# Altium PCB DB32.PcbDoc (part 4 of 8)
Units mil, origin at the board's own origin, x right, y up, seen from the top; angles counter-clockwise.
Board outline 3236.22 x 4456.69 mil, 8 copper layers (Top Layer, MidLayer1, MidLayer2, GND-Layer5, MidLayer3, VCC, MidLayer4, Bottom Layer), stack 61.8 mil thick; 207 components, 474 nets, 1777 pads, 1474 vias.
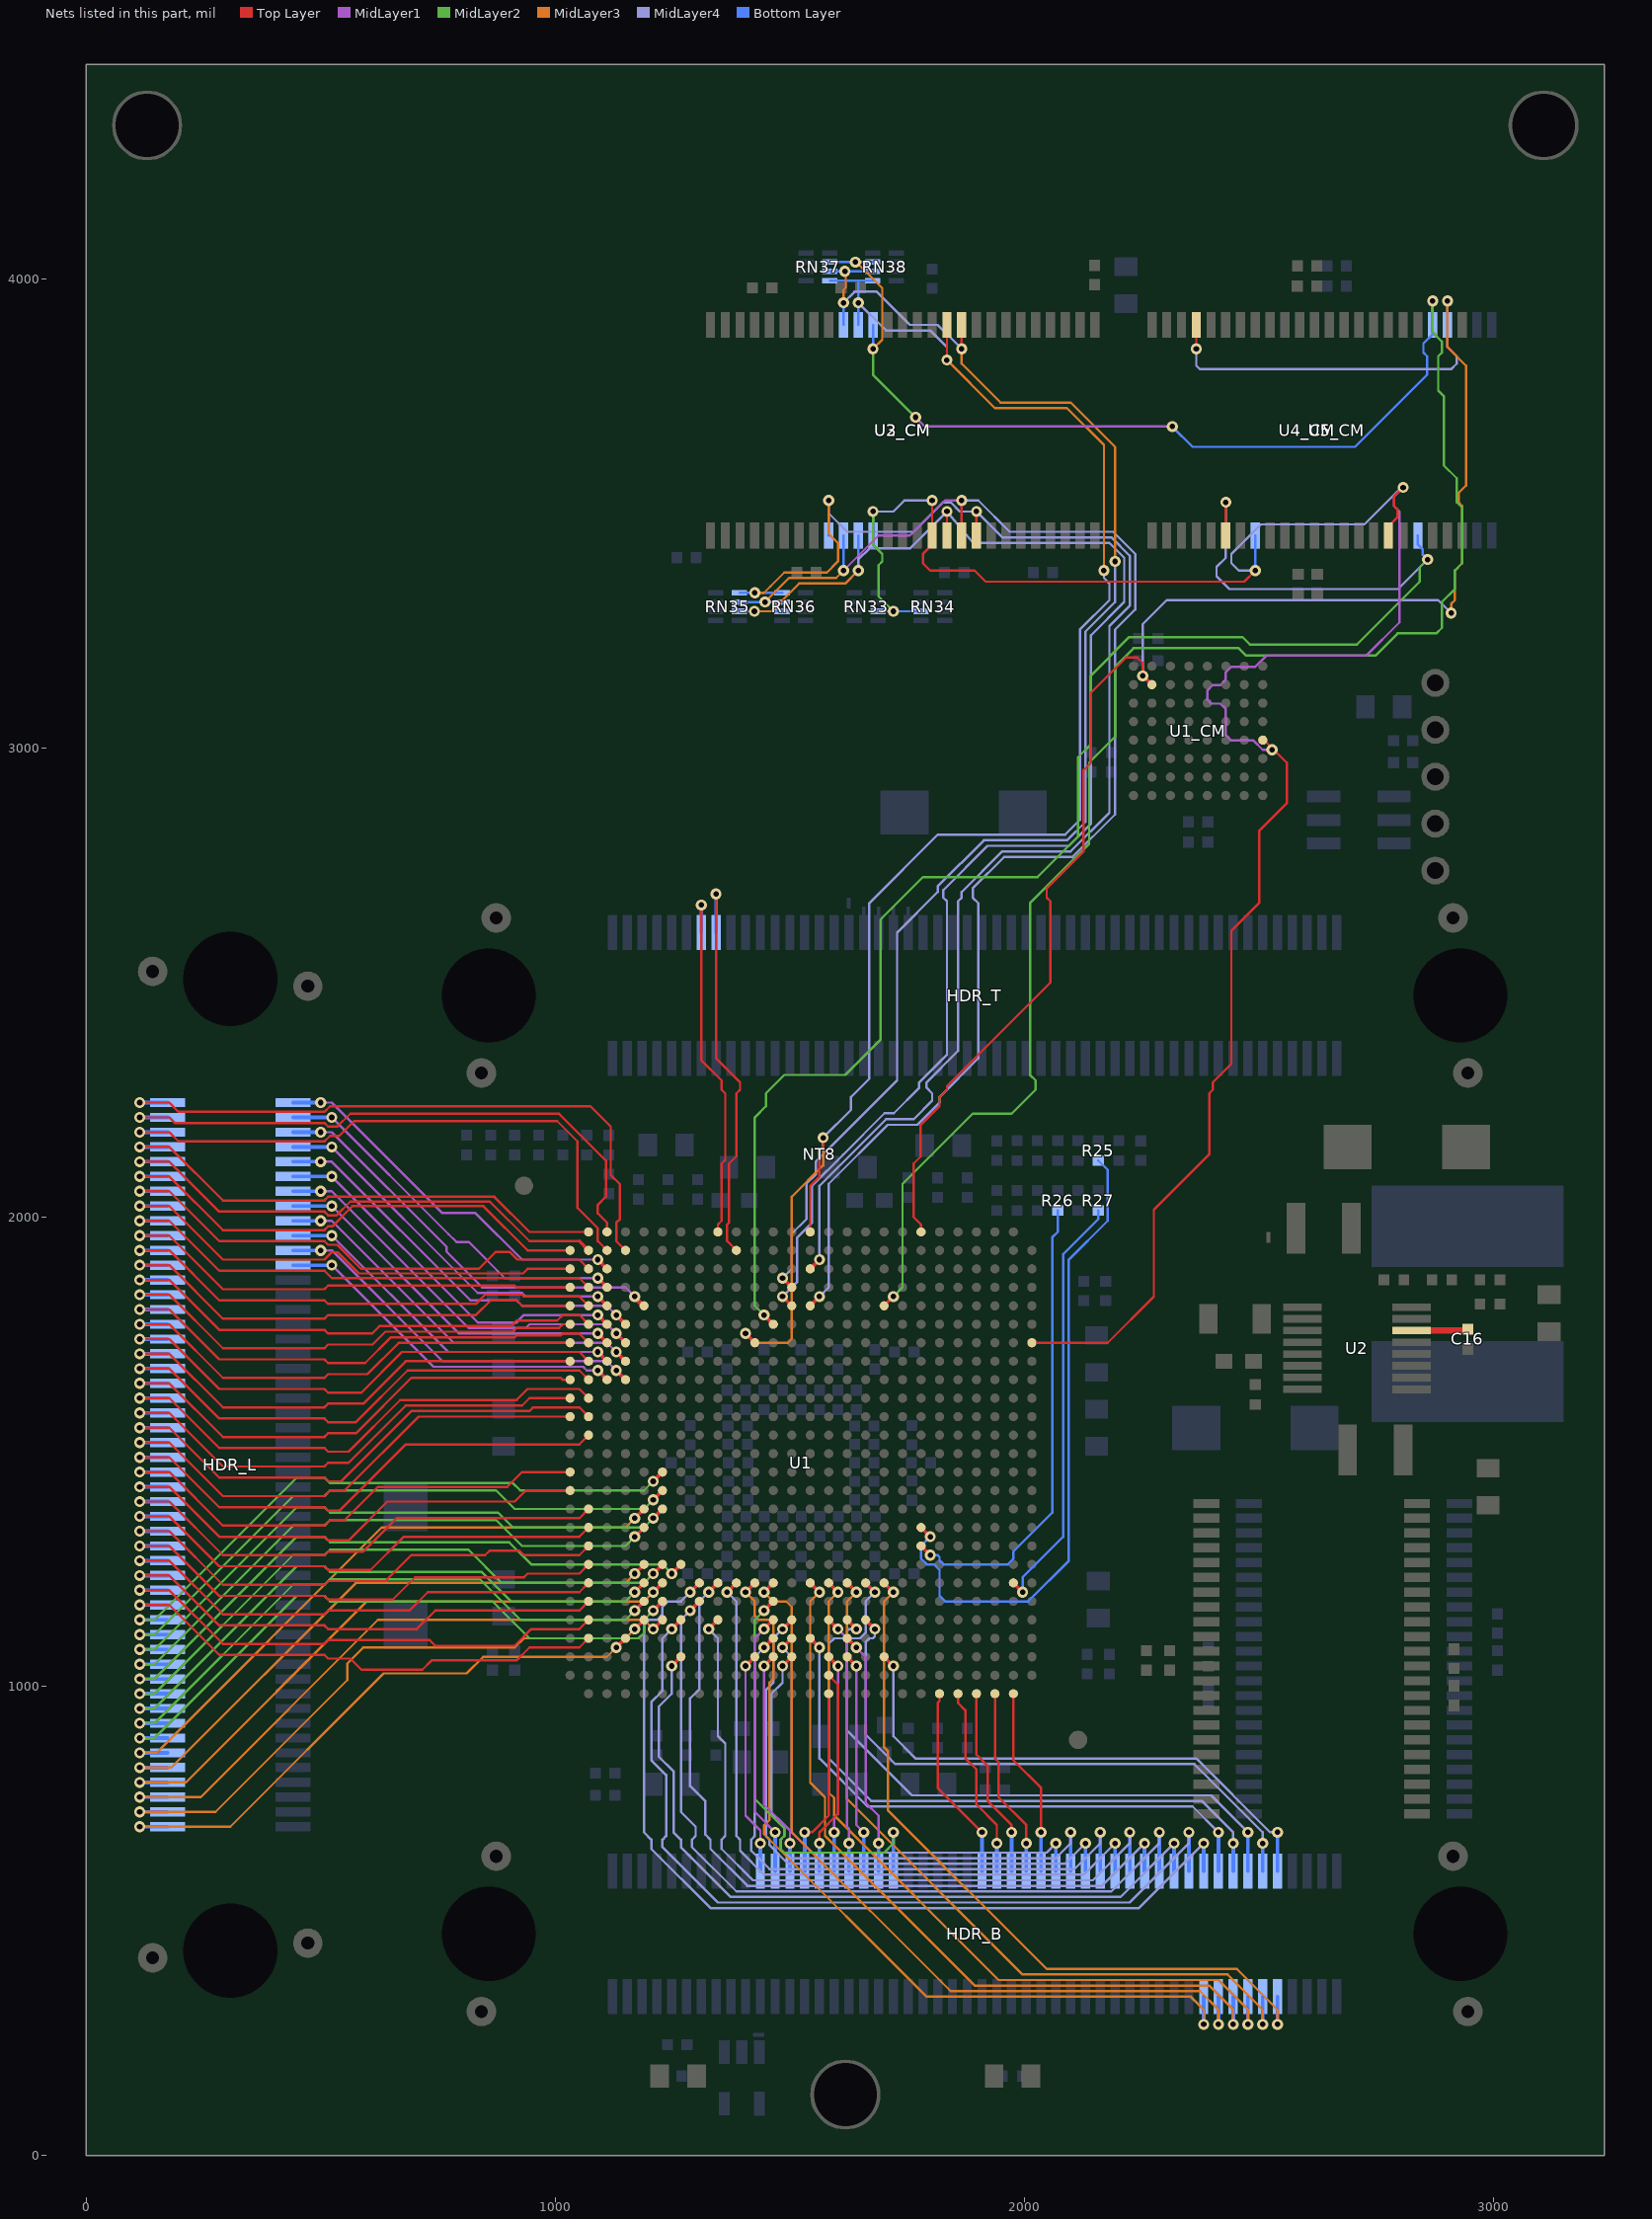
[diagram p10: the nets of this part, all layers, seen from the top]

## Via types
v1: diameter 23.62, hole 11.81, Top Layer to Bottom Layer, 839 vias
v2: diameter 23.62, hole 11.81, Top Layer to Bottom Layer, tented both sides, 499 vias
v3: diameter 27.56, hole 15.75, Top Layer to Bottom Layer, 135 vias
v4: diameter 23.62, hole 11.81, Top Layer to Bottom Layer, tented top, 1 vias

## Nets (pads, with @x,y where several pads share a name; then routed paths per layer and width w, separated by ;. In a path a pad name is that pad's centre, name@x,y a point inside that pad or via, vN(x,y) a via of type N, cw(c..) or ccw(c..) an arc to the next point about the centre after c; other vN are vias at no path point) (continued)
BUS_NBE3: RN37.6 RN38.7 U1.E18 U3_CM.39 U5_CM.40 | length 5006.7
  Top Layer w7.87: U1.E18@1700.79,1811.02 v1(1720.47,1830.71)
  MidLayer1 w5: v2(1767.72,3704.72) 1787.4,3685.04 v2(2314.96,3685.04)
  MidLayer2 w5: v2(1677.17,3850.39) 1677.17,3795.28 v2(1767.72,3704.72) ; v1(1720.47,1830.71) 1740.16,1850.39 1740.16,2031.5 1740.16,2039.37 1740.16,2070.86 1889.76,2220.47 1972.44,2220.47 2023.62,2271.65 2023.62,2291.34 2011.81,2303.15 2011.81,2669.29 2137.8,2795.28 2137.8,2968.5 2192.91,3023.62 2192.91,3173.23 2232.28,3212.6 2456.69,3212.6 2472.44,3196.85 2748.03,3196.85 2795.28,3244.1 2877.95,3244.1 2889.76,3255.91 2889.76,3311.02 2917.32,3338.58 2917.32,3377.95 2933.07,3393.7 2933.07,3511.81 2921.26,3523.62 2921.26,3574.8 2893.7,3602.36 2893.7,3750 2881.89,3761.81 2881.89,3834.65 2889.76,3842.52 2889.76,3866.14 2870.08,3885.83 v2(2870.08,3952.76)
  MidLayer3 w5: v1@1641.54,4035.43 1696.85,3980.12 1696.85,3870.08 v2(1677.17,3850.39)
  Bottom Layer w5: RN37.6@1586.22,4035.43 v1(1639.78,4035.43) RN38.7@1676.19,4035.43 RN38.7@1677.56,4035.43 ; v2(1677.17,3850.39) U3_CM.39@1677.17,3901.57 ; v2(2314.96,3685.04) 2358.27,3641.73 2704.72,3641.73 2858.27,3795.28 2858.27,3834.65 2850.39,3842.52 2850.39,3862.2 2870.08,3881.89 U5_CM.40@2870.08,3901.57 v2(2870.08,3952.76)
BUS_NOE: U1.A20 U1_CM.G2 U4_CM.41 U5_CM.41 | length 3868.3
  Top Layer w5: U1.A20@1779.53,1968.5 1779.53,1984.25 1763.78,2000 1763.78,2031.5 1763.78,2043.31 1763.78,2114.17 1778.54,2128.94 1778.54,2195.87 1818.9,2236.22 1818.9,2255.91 1834.64,2271.65 1834.64,2279.53 2055.12,2500 2055.12,2673.23 2047.24,2681.1 2047.24,2700.79 2125.98,2779.53 2125.98,2952.76 2141.73,2968.5 2141.73,3118.11 2216.54,3192.91 2240.16,3192.91 2251.97,3181.1 v1@2251.97,3154.53 ; v1@2255.91,3150.59 2255.91,3153.54 v1@2255.91,3154.53 ; v2(2366.14,3850.39) U4_CM.41@2366.14,3901.57
  Top Layer w7.87: v1@2251.97,3154.53 2252.46,3154.04 2255.91,3150.59 U1_CM.G2@2271.65,3134.84
  MidLayer3 w5: v2(2901.58,3952.76) 2901.57,3854.33 2940.94,3814.96 2940.94,3559.06 2925.2,3543.31 2925.2,3523.62 2933.07,3515.75 2933.07,3393.7 2917.32,3377.95 2917.32,3314.96 2909.45,3307.09 v1(2909.45,3287.4)
  MidLayer4 w5: v1(2251.97,3153.54) 2251.97,3263.78 2303.15,3314.96 2881.89,3314.96 v1(2909.45,3287.4) ; v2(2366.14,3850.39) 2366.14,3814.96 2374.02,3807.09 2909.45,3807.09 2921.26,3818.9 2921.26,3834.65 2901.58,3854.33 v2(2901.58,3952.76)
  Bottom Layer w5: U5_CM.41@2901.57,3901.57 v2(2901.58,3952.76)
BUS_NWE: RN33.7 RN34.6 U1.G26 U1_CM.A5 U2_CM.16 U3_CM.16 U4_CM.17 U5_CM.17 | length 4738.4
  Top Layer w5: U2_CM.16@1803.14,3452.75 v2(1803.14,3527.55) ; U2_CM.16@1803.15,3460.62 U2_CM.16@1803.15,3452.76 1803.15,3433.07 1783.46,3413.39 1783.46,3393.7 1799.21,3377.95 1893.7,3377.95 1917.32,3354.33 2468.5,3354.33 v1(2492.13,3377.95) ; U1.G26@2015.75,1732.28 2078.74,1732.28 2090.55,1732.28 2177.17,1732.28 2275.59,1830.71 2275.59,2015.75 2393.7,2133.86 2393.7,2263.78 2401.57,2271.65 2401.57,2287.4 2440.94,2326.77 2440.94,2610.24 2500,2669.29 2500,2822.83 2559.06,2881.89 2559.06,2968.5 2529.53,2998.03 2510.82,3016.74 U1_CM.A5@2507.87,3016.73 ; U4_CM.17@2775.59,3452.76 2775.59,3472.44 2795.28,3492.13 2795.28,3507.87 2787.4,3515.75 2787.4,3535.43 v1(2807.09,3555.12)
  MidLayer1 w5: v1(2527.56,2996.06) 2507.87,2996.06 2488.19,3015.75 2440.94,3015.75 2429.13,3027.56 2429.13,3082.68 2417.32,3094.49 2397.64,3094.49 2389.76,3102.36 2389.76,3122.05 2401.57,3133.86 2417.32,3133.86 2429.13,3145.67 2429.13,3161.42 2440.94,3173.23 2492.13,3173.23 2515.75,3196.85 2728.35,3196.85 2799.21,3267.72 2799.21,3503.94 2787.4,3515.75 2787.4,3535.43 v1(2807.09,3555.12)
  MidLayer2 w5: v2(1677.17,3503.94) 1677.17,3433.07 1696.85,3413.39 1696.85,3397.64 1688.98,3389.76 1688.98,3322.83 v1(1720.47,3291.34)
  MidLayer4 w5: v2(1677.17,3503.94) 1720.47,3503.94 1744.09,3527.55 v2(1803.14,3527.55) ; v1(2492.13,3377.95) 2456.69,3377.95 2440.94,3393.7 2440.94,3413.39 2503.94,3476.38 2724.41,3476.38 v1@2805.12,3557.09
  Bottom Layer w5: U3_CM.16@1677.17,3452.76 v2(1677.17,3503.94) ; RN33.7@1688.18,3291.34 v1(1720.47,3291.34) RN34.6@1779.53,3291.34 RN34.6@1779.92,3291.34 ; v1(2492.13,3377.95) U5_CM.17@2492.13,3452.76
BUS_SDRAM_CKE: RN37.7 RN38.6 U1.D13 U2_CM.37 U3_CM.37 | length 3199.4
  Top Layer w5: v2(1866.14,3850.39) U2_CM.37@1866.14,3901.57
  Top Layer w7.87: v1(1484.25,1870.08) U1.D13@1503.94,1850.39
  MidLayer3 w5: v2(1614.17,3948.82) 1614.17,3976.38 1618.9,3981.11 v1@1618.9,4015.75 ; v2(1866.14,3850.39) 1866.14,3818.9 1948.82,3736.22 2098.43,3736.22 2192.91,3641.73 v1(2192.91,3397.64)
  MidLayer4 w5: v1(1484.25,1870.08) 1503.94,1889.76 1503.94,1964.57 1535.43,1996.06 1535.43,2031.5 1535.43,2043.31 1535.43,2070.87 1555.12,2090.55 1555.12,2118.11 1728.35,2291.34 1728.35,2606.3 1814.96,2692.91 1814.96,2704.72 1913.39,2803.15 2090.55,2803.15 2129.92,2842.52 2129.92,3248.03 2192.91,3311.02 v1(2192.91,3397.64) ; v2(1614.17,3948.82) 1637.8,3972.44 1685.04,3972.44 1755.91,3901.57 1814.96,3901.57 v2(1866.14,3850.39)
  Bottom Layer w5: RN37.7@1586.22,4015.75 v1(1617.14,4015.75) RN38.6@1676.19,4015.75 RN38.6@1677.56,4015.75 ; U3_CM.37@1614.17,3901.57 v2(1614.17,3948.82)
BUS_SDRAM_CLK: NT8.2 RN37.8 RN38.5 U1.G11 U2_CM.38 U3_CM.38 | length 3444.5
  Top Layer w5: NT8.2@1562.99,2141.73 1570.87,2149.61 v1(1570.87,2169.29) ; v2(1834.64,3826.77) U2_CM.38@1834.65,3901.57
  Top Layer w7.87: v1(1405.51,1751.97) U1.G11@1425.2,1732.28
  MidLayer3 w5: v1(1405.51,1751.97) 1425.2,1732.28 1496.06,1732.28 1503.94,1740.16 1503.94,2043.31 1570.87,2110.24 v1(1570.87,2169.29) ; v2(1834.64,3826.77) 1937,3724.41 2090.55,3724.41 2169.29,3645.67 v1(2169.29,3377.95)
  MidLayer4 w5: v1(1570.87,2169.29) 1629.92,2228.35 1629.92,2255.91 1669.29,2295.28 1669.29,2669.29 1814.96,2814.96 2086.61,2814.96 2118.11,2846.46 2118.11,3251.97 2181.1,3314.96 2181.1,3350.39 2169.29,3362.2 v1(2169.29,3377.95) ; v2(1645.67,3948.82) 1704.72,3889.76 1799.21,3889.76 1834.64,3854.34 v2(1834.64,3826.77)
  Bottom Layer w5: RN37.8@1586.22,3996.06 RN38.5@1676.19,3996.06 RN38.5@1677.56,3996.06 ; U3_CM.38@1645.67,3901.57 v2(1645.67,3948.82) 1645.67,3996.06
BUS_SDRAM_FEEDBACK: NT8.1 U1.A14 | length 165.6
  Top Layer w5: U1.A14@1543.31,1968.5 1543.31,2066.93 1562.99,2086.61 NT8.1@1562.99,2125.98
BUS_SDRAM_NCAS: RN35.7 RN36.6 U1.E13 U2_CM.17 U3_CM.17 | length 3175.8
  Top Layer w5: U2_CM.17@1834.65,3452.76 1834.64,3499.99 v1(1834.65,3503.94)
  Top Layer w7.87: v1(1484.25,1830.71) U1.E13@1503.94,1811.02
  MidLayer3 w5: v1(1424.23,3291.34) 1460.63,3291.34 1519.68,3350.39 1618.11,3350.39 v2(1645.67,3377.95)
  MidLayer4 w5: v1(1484.25,1830.71) 1515.75,1862.2 1515.75,1956.69 1547.24,1988.19 1547.24,2031.5 1547.49,2043.31 1547.49,2067.18 1613.19,2132.87 1701.77,2221.46 1721.46,2221.46 1775.59,2275.59 1775.59,2287.4 1834.65,2346.46 1834.65,2673.23 1826.77,2681.1 1826.77,2696.85 1921.26,2791.34 2094.49,2791.34 2141.73,2838.58 2141.73,3240.16 2212.6,3311.02 2212.6,3405.51 2181.1,3437.01 1890.42,3437.01 v1(1834.65,3503.94) 1755.91,3425.2 1669.29,3425.2 1645.67,3401.57 v2(1645.67,3377.95)
  Bottom Layer w5: RN35.7@1393.3,3291.34 v1(1424.23,3291.34) RN36.6@1483.28,3291.34 RN36.6@1484.64,3291.34 ; v2(1645.67,3377.95) U3_CM.17@1645.67,3452.76
BUS_SDRAM_NCS: RN35.5 RN36.8 U1.C14 U2_CM.19 U3_CM.19 | length 3250.4
  Top Layer w5: U2_CM.19@1897.64,3452.76 v2(1897.63,3503.93)
  Top Layer w7.87: U1.C14@1543.31,1889.76 v1(1562.99,1909.45)
  MidLayer3 w5: v1(1425.2,3330.71) 1444.88,3330.71 1458.54,3344.36 1488.19,3374.02 1578.74,3374.02 1602.36,3397.64 1602.36,3437.01 1582.68,3456.69 v2(1582.68,3527.56)
  MidLayer4 w5: v1(1562.99,1909.45) 1562.99,2031.5 1562.99,2043.31 1562.99,2066.93 1704.72,2208.66 1763.78,2208.66 1803.15,2248.03 1803.15,2263.78 1791.34,2275.59 1791.34,2287.4 1858.27,2354.33 1858.27,2673.23 1866.14,2681.1 1866.14,2692.91 1952.76,2779.53 2098.43,2779.53 2181.1,2862.2 2181.1,3259.84 2224.41,3303.15 2224.41,3409.45 2185.04,3448.82 1952.76,3448.82 v2(1897.63,3503.93) 1862.21,3503.93 1842.52,3523.62 1826.77,3523.62 1763.78,3460.63 1622.05,3460.63 1582.68,3500 v2(1582.68,3527.56)
  Bottom Layer w5: RN35.5@1393.31,3330.71 v1(1425.2,3330.71) RN36.8@1483.28,3330.71 RN36.8@1484.26,3330.71 ; U3_CM.19@1582.68,3452.76 v2(1582.68,3527.56)
BUS_SDRAM_NRAS: RN35.6 RN36.7 U1.E14 U2_CM.18 U3_CM.18 | length 3197.5
  Top Layer w5: U2_CM.18@1866.14,3452.76 v1(1866.14,3527.55)
  Top Layer w7.87: U1.E14@1543.31,1811.02 v1(1562.99,1830.71)
  MidLayer1 w5: v2(1614.17,3377.95) 1688.98,3452.76 1755.91,3452.76 1830.7,3527.55 v1(1866.14,3527.55)
  MidLayer3 w5: v1(1446.86,3311.02) 1498.05,3362.2 1598.43,3362.2 v2(1614.17,3377.95)
  MidLayer4 w5: v1(1562.99,1830.71) 1582.68,1850.39 1582.68,2031.5 1582.68,2043.31 1582.68,2070.87 1708.66,2196.85 1771.65,2196.85 1818.9,2244.09 1818.9,2255.91 1901.57,2338.58 1901.57,2669.29 1889.76,2681.1 1889.76,2700.79 1956.69,2767.72 2102.36,2767.72 2192.91,2858.27 2192.91,3251.97 2236.22,3295.28 2236.22,3413.39 2188.98,3460.63 1968.5,3460.63 1901.58,3527.55 v1(1866.14,3527.55) v1@1858.27,3531.5
  Bottom Layer w5: RN35.6@1393.3,3311.02 v1(1446.86,3311.02) RN36.7@1483.28,3311.03 RN36.7@1484.64,3311.02 ; v2(1614.17,3377.95) U3_CM.18@1614.17,3452.76
BUS_SRAM_NCS: U1.F12 U4_CM.6 U5_CM.6 | length 3549.4
  Top Layer w5: U4_CM.6@2429.13,3452.76 2429.13,3503.94 v2(2429.13,3523.62)
  Top Layer w7.87: v1(1444.88,1791.34) U1.F12@1464.57,1771.65
  MidLayer2 w5: v1(1444.88,1791.34) 1425.2,1811.02 1425.2,2031.49 1425.2,2043.31 1425.2,2212.6 1448.82,2236.22 1448.82,2244.09 1448.82,2263.78 1488.19,2303.15 1618.11,2303.15 1692.91,2377.95 1692.91,2633.86 1783.46,2724.41 2027.56,2724.41 2114.17,2811.02 2114.17,2980.32 2141.73,3007.87 2141.73,3154.53 2223.42,3236.22 2464.57,3236.22 2480.32,3220.47 2708.66,3220.47 2842.52,3354.33 2842.52,3384.83 v2(2859.27,3401.57)
  MidLayer4 w5: v2(2429.13,3523.62) 2429.13,3405.51 2409.45,3385.83 2409.45,3366.14 2437.01,3338.58 2796.28,3338.58 v2(2859.27,3401.57)
  Bottom Layer w5: U5_CM.6@2838.58,3452.76 2838.58,3433.42 2848.92,3423.08 2848.92,3411.92 v2(2859.27,3401.57)
BUZZER: HDR_B.40 U1.AA12 | length 931.1
  Top Layer w7.87: v1(1444.88,1161.42) U1.AA12@1464.57,1181.1
  MidLayer2 w5: v1(1444.88,1161.42) 1425.2,1141.73 1425.2,921.26 1425.2,909.45 1425.2,759.84 1488.19,696.85 1488.19,681.1 1480.31,673.23 1480.31,653.54 1488.19,645.67 1700.79,645.67 1720.47,665.35 v2(1720.47,688.98)
  Bottom Layer w7.87: HDR_B.40@1720.48,606.3 v2(1720.47,688.98)
CAN_RXD: HDR_T.14 U1.A9 | length 783.6
  Top Layer w5: v2(1311.02,2665.35) 1311.02,2334.65 1354.33,2291.34 1354.33,2271.65 1362.2,2263.78 1362.2,2122.05 1354.33,2114.17 1354.33,2043.31 1354.33,2031.5 1354.33,1992.13 1346.46,1984.25 U1.A9@1346.46,1968.5
  Bottom Layer w7.87: HDR_T.14@1311.02,2606.3 v2(1311.02,2665.35)
CAN_TXD: HDR_T.16 U1.B10 | length 883.3
  Top Layer w5: v2(1342.52,2688.98) 1342.52,2338.58 1393.7,2287.4 1393.7,2271.65 1385.83,2263.78 1385.83,2129.92 1370.08,2114.17 1370.08,2043.31 1370.08,2031.5 1370.08,1988.19 1366.14,1984.25 1366.14,1948.82 U1.B10@1385.83,1929.13
  Bottom Layer w7.87: HDR_T.16@1342.52,2606.3 v2(1342.52,2688.98)
CCLK: R26.2 U1.V20 | length 1004.4
  Top Layer w7.87: U1.V20@1779.53,1299.21 v1(1799.21,1279.53)
  Bottom Layer w5: v1(1799.21,1279.53) 1814.96,1279.53 1818.9,1275.59 1818.9,1267.72 1826.77,1259.84 1964.57,1259.84 1976.38,1271.65 1976.38,1287.4 2059.06,1370.08 2059.06,1956.69 2070.86,1968.5 R26.2@2070.86,2014.25
COMP: C16.2 U2.6 | length 121.4
  Top Layer w13.78: U2.6@2824.58,1758.25 2942.3,1758.25 C16.2@2944.88,1760.82
DATA_DIN: R27.2 U1.Y25 | length 908.2
  Top Layer w7.87: U1.Y25@1976.38,1220.47 v1(1996.07,1200.79)
  Bottom Layer w5: v1(1996.07,1200.79) 1996.07,1232.29 2082.68,1318.9 2082.68,1921.26 2157.48,1996.06 R27.2@2157.48,2014.25
DAU_RESET_SW: HDR_B.38 U1.AC16 | length 523.8
  Top Layer w7.87: U1.AC16@1622.05,1102.36 v1(1641.73,1082.68)
  MidLayer1 w5: v1(1641.73,1082.68) 1661.42,1062.99 1661.42,921.26 1661.42,909.45 1661.42,751.97 1688.98,724.41 v2(1688.98,665.35)
  Bottom Layer w7.87: HDR_B.38@1688.98,606.3 v2(1688.98,665.35)
DAU_TFT_BLIGHT: HDR_B.91 U1.Y18 | length 1601.2
  Top Layer w7.87: U1.Y18@1700.79,1220.47 v1(1720.47,1200.79)
  MidLayer3 w5: v1(1720.47,1200.79) 1700.79,1181.1 1700.79,921.26 1700.79,909.45 1700.79,870.08 1708.66,862.2 1708.66,736.22 2047.24,397.64 2452.76,397.64 2539.37,311.02 v2(2539.37,279.53)
  Bottom Layer w7.87: v2(2539.37,279.53) HDR_B.91@2539.37,338.58
DAU_TFT_BLUE0: HDR_B.62 U1.AC13 | length 1077.8
  Top Layer w7.87: v1(1484.25,1082.68) U1.AC13@1503.94,1102.36
  MidLayer4 w5: v1(1484.25,1082.68) 1503.94,1062.99 1503.94,921.26 1503.94,909.45 1503.94,688.98 1547.24,645.67 2047.24,645.67 v2(2066.93,665.35)
  Bottom Layer w7.87: HDR_B.62@2066.93,606.3 v2(2066.93,665.35)
DAU_TFT_BLUE1: HDR_B.64 U1.AD13 | length 1187.7
  Top Layer w7.87: v1(1484.25,1043.31) U1.AD13@1503.94,1062.99
  MidLayer4 w5: v1(1484.25,1043.31) 1484.25,1007.87 1460.63,984.25 1460.63,921.26 1460.63,909.45 1460.63,728.35 1488.19,700.79 1488.19,681.1 1480.31,673.23 1480.31,653.54 1500,633.86 2066.93,633.86 2098.42,665.35 v2(2098.42,688.98)
  Bottom Layer w7.87: v2(2098.42,688.98) HDR_B.64@2098.43,606.3
DAU_TFT_BLUE2: HDR_B.66 U1.AB13 | length 1272.9
  Top Layer w7.87: v1(1484.25,1122.05) U1.AB13@1503.94,1141.73
  MidLayer4 w5: v1(1484.25,1122.05) 1464.57,1102.36 1464.57,1007.87 1448.82,992.13 1448.82,921.26 1448.82,909.45 1448.82,681.1 1456.69,673.23 1456.69,661.42 1496.06,622.05 2086.62,622.05 v2(2129.92,665.35)
  Bottom Layer w7.87: HDR_B.66@2129.92,606.3 v2(2129.92,665.35)
DAU_TFT_BLUE3: HDR_B.68 U1.AC12 | length 1361.9
  Top Layer w7.87: v1(1444.88,1082.68) U1.AC12@1464.57,1102.36
  MidLayer4 w5: v1(1444.88,1082.68) 1425.2,1062.99 1425.2,921.26 1425.2,909.45 1425.2,681.1 1417.32,673.23 1417.32,649.61 1456.69,610.24 2106.3,610.24 2161.42,665.35 v2(2161.42,688.98)
  Bottom Layer w7.87: HDR_B.68@2161.42,606.3 v2(2161.42,688.98)
DAU_TFT_BLUE4: HDR_B.70 U1.Y10 | length 1497.6
  Top Layer w7.87: v1(1366.14,1200.79) U1.Y10@1385.83,1220.47
  MidLayer4 w5: v1(1366.14,1200.79) 1385.83,1181.1 1385.83,921.26 1385.83,909.45 1385.83,681.1 1393.7,673.23 1393.7,649.61 1444.88,598.43 2125.98,598.43 v2(2192.91,665.35)
  Bottom Layer w7.87: HDR_B.70@2192.92,606.3 v2(2192.91,665.35)
DAU_TFT_CL1: HDR_B.88 U1.Y17 | length 1385.8
  Top Layer w7.87: U1.Y17@1661.42,1220.47 v1(1681.1,1200.79)
  MidLayer4 w5: v1(1681.1,1200.79) 1661.42,1181.1 1661.42,1114.17 1649.61,1102.36 1629.92,1102.36 1622.05,1094.49 1622.05,921.26 1622.05,909.45 1622.05,905.51 1759.84,767.72 2397.64,767.72 v2@2476.38,688.98
  Bottom Layer w7.87: HDR_B.88@2476.38,606.3 v2(2476.38,688.98)
DAU_TFT_CL2: HDR_B.90 U1.AB17 | length 1339.6
  Top Layer w7.87: U1.AB17@1661.42,1141.73 v1(1681.1,1122.05)
  MidLayer4 w5: v1(1681.1,1122.05) 1681.1,1106.3 1677.17,1102.36 1669.29,1102.36 1661.42,1094.49 1661.42,921.26 1661.42,909.45 1661.42,897.64 1724.41,834.65 2362.2,834.65 2507.87,688.98 v2(2507.87,665.35)
  Bottom Layer w7.87: v2(2507.87,665.35) HDR_B.90@2507.88,606.3 v2(2507.87,665.35)
DAU_TFT_CL3: HDR_B.92 U1.AD18 | length 1163.8
  Top Layer w7.87: U1.AD18@1700.79,1062.99 v1(1720.47,1043.31)
  MidLayer4 w5: v1(1720.47,1043.31) 1720.47,921.26 1720.47,909.45 1720.47,893.7 1767.72,846.46 2366.14,846.46 2523.62,688.98 v2(2539.37,688.98)
  Bottom Layer w7.87: HDR_B.92@2539.37,606.3 v2(2539.37,688.98)
DAU_TFT_DISP_ON: HDR_B.89 U1.Y16 | length 1639.2
  Top Layer w7.87: U1.Y16@1622.05,1220.47 v1(1641.73,1200.79)
  MidLayer3 w5: v1(1641.73,1200.79) 1622.05,1181.1 1622.05,921.26 1622.05,909.45 1622.05,759.84 1996.06,385.83 2433.07,385.83 2507.87,311.02 v2(2507.88,279.53)
  Bottom Layer w7.87: v2(2507.88,279.53) HDR_B.89@2507.88,338.58
DAU_TFT_GREEN0: HDR_B.72 U1.AB9 | length 1551
  Top Layer w7.87: v1(1326.77,1122.05) U1.AB9@1346.46,1141.73
  MidLayer4 w5: v1(1326.77,1122.05) 1346.46,1102.36 1346.46,921.26 1346.46,909.45 1346.46,893.7 1362.2,877.95 1362.2,681.1 1354.33,673.23 1354.33,653.54 1421.26,586.61 2145.67,586.61 2224.41,665.36 v2(2224.41,688.98)
  Bottom Layer w7.87: HDR_B.72@2224.41,606.3 v2(2224.41,688.98)
DAU_TFT_GREEN1: HDR_B.74 U1.Y9 | length 1663.7
  Top Layer w7.87: v1(1326.77,1200.79) U1.Y9@1346.46,1220.47
  MidLayer4 w5: v1(1326.77,1200.79) 1307.09,1181.1 1307.09,994.09 1287.4,974.41 1287.4,921.26 1287.4,909.45 1287.4,787.4 1319.88,754.92 1319.88,684.06 1330.71,673.23 1330.71,653.54 1409.45,574.8 2165.35,574.8 v2(2255.9,665.35)
  Bottom Layer w7.87: HDR_B.74@2255.91,606.3 v2(2255.9,665.35)
DAU_TFT_GREEN2: HDR_B.76 U1.AA8 | length 1740.1
  Top Layer w7.87: v1(1287.4,1161.42) U1.AA8@1307.09,1181.1
  MidLayer4 w5: v1(1287.4,1161.42) 1267.72,1141.73 1267.72,921.26 1267.72,909.45 1267.72,732.28 1299.21,700.79 1299.21,681.1 1291.34,673.23 1291.34,657.48 1385.83,562.99 2185.04,562.99 2287.4,665.35 v2(2287.4,688.98)
  Bottom Layer w7.87: HDR_B.76@2287.41,606.3 v2(2287.4,688.98)
DAU_TFT_GREEN3: HDR_B.78 U1.AD7 | length 1646.2
  Top Layer w7.87: v1(1248.03,1043.31) U1.AD7@1267.72,1062.99
  MidLayer4 w5: v1(1248.03,1043.31) 1248.03,984.25 1220.47,956.69 1220.47,921.26 1220.47,909.45 1220.47,850.39 1251.97,818.9 1251.97,688.98 1267.72,673.23 1267.72,657.48 1374.02,551.18 2204.72,551.18 v2(2318.9,665.35)
  Bottom Layer w7.87: HDR_B.78@2318.9,606.3 v2(2318.9,665.35)
DAU_TFT_GREEN4: HDR_B.80 U1.AB7 | length 1856.1
  Top Layer w7.87: v1(1248.03,1122.05) U1.AB7@1267.72,1141.73
  MidLayer4 w5: v1(1248.03,1122.05) 1228.35,1102.36 1228.35,990.16 1204.72,966.53 1204.72,921.26 1204.72,909.45 1204.72,842.52 1236.22,811.02 1236.22,681.1 1228.35,673.23 1228.35,657.48 1346.46,539.37 2224.41,539.37 2350.39,665.35 v2(2350.39,688.98)
  Bottom Layer w7.87: HDR_B.80@2350.4,606.3 v2(2350.39,688.98)
DAU_TFT_GREEN5: HDR_B.82 U1.Y8 | length 1993.2
  Top Layer w7.87: v1(1287.4,1200.79) U1.Y8@1307.09,1220.47
  MidLayer4 w5: v1(1287.4,1200.79) 1267.72,1181.1 1240.16,1181.1 1228.35,1169.29 1228.35,1153.54 1216.54,1141.73 1200.79,1141.73 1188.98,1129.92 1188.98,921.26 1188.98,909.45 1188.98,688.98 1204.72,673.23 1204.72,653.54 1330.71,527.56 2244.09,527.56 v2(2381.89,665.35)
  Bottom Layer w7.87: HDR_B.82@2381.89,606.3 v2(2381.89,665.35)
DAU_TFT_IRQ: HDR_B.81 U1.Y11 | length 1772.5
  Top Layer w7.87: v1(1405.51,1200.79) U1.Y11@1425.2,1220.47
  MidLayer3 w5: v1(1405.51,1200.79) 1425.2,1181.1 1425.2,1149.61 1433.07,1141.73 1456.69,1141.73 1464.57,1133.86 1464.57,1015.75 1456.69,1007.87 1456.69,921.26 1456.69,909.45 1456.69,715.55 1444.88,703.74 1444.88,685.04 1791.34,338.58 2354.33,338.58 2381.89,311.02 v2(2381.89,279.53)
  Bottom Layer w7.87: v2(2381.89,279.53) HDR_B.81@2381.89,338.58
DAU_TFT_M: HDR_B.87 U1.Y15 | length 1660.9
  Top Layer w7.87: U1.Y15@1582.68,1220.47 v1(1602.36,1200.79)
  MidLayer3 w5: v1(1602.36,1200.79) 1582.68,1181.1 1582.68,921.26 1582.68,909.45 1582.68,773.62 1594.49,761.81 1594.49,724.41 1944.88,374.02 2413.39,374.02 2476.38,311.02 v2(2476.38,279.53)
  Bottom Layer w7.87: v2(2476.38,279.53) HDR_B.87@2476.38,338.58
DAU_TFT_MUX: HDR_B.85 U1.Y14 | length 1682.7
  Top Layer w7.87: U1.Y14@1543.31,1220.47 v1(1562.99,1200.79)
  MidLayer3 w5: v1(1562.99,1200.79) 1543.31,1181.1 1543.31,921.26 1543.31,909.45 1543.31,795.28 1574.8,763.78 1574.8,681.1 1893.7,362.2 2393.7,362.2 2444.88,311.02 v2(2444.88,279.53)
  Bottom Layer w7.87: v2(2444.88,279.53) HDR_B.85@2444.89,338.58
DAU_TFT_POL: HDR_B.83 U1.Y12 | length 1736.8
  Top Layer w7.87: v1(1444.88,1200.79) U1.Y12@1464.57,1220.47
  MidLayer3 w5: v1(1444.88,1200.79) 1464.57,1181.1 1492.12,1181.1 1503.93,1169.29 1503.93,921.26 1503.94,909.45 1503.94,688.98 1842.52,350.39 2374.02,350.39 2413.39,311.03 v2(2413.39,279.53)
  Bottom Layer w7.87: v2(2413.39,279.53) HDR_B.83@2413.39,338.58
DAU_TFT_RED0: HDR_B.52 U1.AF21 | length 420.7
  Top Layer w5: U1.AF21@1814.96,984.25 1816.93,982.28 1818.9,980.32 1818.9,968.5 1814.96,964.57 1814.96,921.26 1814.96,910.43 1814.96,783.22 v2@1909.33,688.85 ; v2@1909.45,688.73 v2(1909.45,688.98)
  Bottom Layer w7.87: HDR_B.52@1909.45,606.3 v2(1909.45,688.98)
DAU_TFT_RED1: HDR_B.54 U1.AF22 | length 412.2
  Top Layer w5: U1.AF22@1858.27,984.25 1858.27,964.57 1874.02,948.82 1874.02,921.26 1874.02,909.45 1874.02,846.46 1897.64,822.83 1897.64,748.03 1940.94,704.73 v2(1940.94,665.35)
  Bottom Layer w7.87: HDR_B.54@1940.95,606.3 v2(1940.94,665.35)
DAU_TFT_RED2: HDR_B.56 U1.AF23 | length 408.9
  Top Layer w5: U1.AF23@1897.64,984.25 1897.64,921.26 1897.64,909.45 1897.64,854.33 1921.26,830.71 1921.26,755.91 1972.44,704.73 v2(1972.44,688.98)
  Bottom Layer w7.87: HDR_B.56@1972.44,606.3 v2(1972.44,688.98)
DAU_TFT_RED3: HDR_B.58 U1.AF24 | length 405.7
  Top Layer w5: U1.AF24@1937.01,984.25 1937.01,921.26 1937.01,909.45 1937.01,846.46 1944.88,838.58 1944.88,763.78 2003.94,704.73 v2(2003.94,665.35)
  Bottom Layer w7.87: HDR_B.58@2003.94,606.3 v2(2003.94,665.35)
DAU_TFT_RED4: HDR_B.60 U1.AF25 | length 402.4
  Top Layer w5: U1.AF25@1976.38,984.25 1976.38,921.26 1976.38,909.45 1976.38,842.52 2035.43,783.47 v2(2035.43,688.98)
  Bottom Layer w7.87: HDR_B.60@2035.44,606.3 v2(2035.43,688.98)
DAU_TFT_STH: HDR_B.86 U1.AB16 | length 1358.8
  Top Layer w7.87: U1.AB16@1622.05,1141.73 v1(1641.73,1122.05)
  MidLayer4 w5: v1(1641.73,1122.05) 1625.98,1122.05 1622.05,1118.11 1622.05,1110.24 1614.17,1102.36 1594.49,1102.36 1582.68,1090.55 1582.68,921.26 1582.68,909.45 1582.68,846.46 1673.23,755.91 2377.95,755.91 2444.88,688.98 v2(2444.88,665.35)
  Bottom Layer w7.87: HDR_B.86@2444.89,606.3 v2(2444.88,665.35)
DAU_TFT_STV: HDR_B.84 U1.AC14 | length 1262.4
  Top Layer w7.87: U1.AC14@1543.31,1102.36 v1(1562.99,1082.68)
  MidLayer4 w5: v1(1562.99,1082.68) 1562.99,921.26 1562.99,909.45 1562.99,846.46 1665.35,744.09 2358.27,744.09 v2@2413.38,688.98
  Bottom Layer w7.87: HDR_B.84@2413.39,606.3 v2(2413.38,688.98)
DIP0: HDR_B.22 U1.AD11 | length 477.9
  Top Layer w7.87: v1(1405.51,1043.31) U1.AD11@1425.2,1062.99
  MidLayer1 w5: v1(1405.51,1043.31) 1405.51,921.26 1405.51,909.45 1405.51,724.41 1437.01,692.91 v2(1437.01,665.35)
  Bottom Layer w7.87: HDR_B.22@1437.01,606.3 v2(1437.01,665.35)
DIP1: HDR_B.24 U1.AB12 | length 569.7
  Top Layer w7.87: v1(1444.88,1122.05) U1.AB12@1464.57,1141.73
  MidLayer1 w5: v1(1444.88,1122.05) 1425.2,1102.36 1425.2,921.26 1425.2,909.45 1425.2,732.28 v2(1468.5,688.98)
  Bottom Layer w7.87: HDR_B.24@1468.51,606.3 v2(1468.5,688.98)
DIP2: HDR_B.26 U1.AD12 | length 487.7
  Top Layer w7.87: v1(1444.88,1043.31) U1.AD12@1464.57,1062.99
  MidLayer1 w5: v1(1444.88,1043.31) 1444.88,921.26 1444.88,909.45 1444.88,748.03 1500,692.91 v2(1500,665.35)
  Bottom Layer w7.87: HDR_B.26@1500,606.3 v2(1500,665.35)
DIP3: HDR_B.28 U1.AF15 | length 412.3
  Top Layer w5: v2@1527.56,688.98 v2(1531.5,688.98) 1547.24,688.98 1582.68,724.41 1582.68,909.45 1582.68,921.26 U1.AF15@1582.68,984.25
  Bottom Layer w7.87: HDR_B.28@1531.5,606.3 v2(1531.5,688.98)
DIP4: HDR_B.30 U1.AE15 | length 441.8
  Top Layer w5: v2(1562.99,665.35) 1562.99,688.98 1602.36,728.35 1602.36,909.45 1602.36,921.26 1602.36,1003.93 U1.AE15@1582.68,1023.62
  Bottom Layer w7.87: HDR_B.30@1562.99,606.3 v2(1562.99,665.35)
DIP5: HDR_B.32 U1.AD15 | length 468.1
  Top Layer w7.87: U1.AD15@1582.68,1062.99 v1(1602.36,1043.31)
  MidLayer1 w5: v2(1594.49,688.98) 1594.49,720.47 1602.36,728.35 1602.36,909.45 1602.36,921.26 v1(1602.36,1043.31)
  Bottom Layer w7.87: HDR_B.32@1594.49,606.3 v2(1594.49,688.98)
DIP6: HDR_B.34 U1.AB15 | length 553.4
  Top Layer w7.87: U1.AB15@1582.68,1141.73 v1(1602.36,1122.05)
  MidLayer1 w5: v1(1602.36,1122.05) 1622.05,1102.36 1622.05,921.26 1622.05,909.45 1622.05,700.79 1625.98,696.85 v2(1625.98,665.35)
  Bottom Layer w7.87: HDR_B.34@1625.99,606.3 v2(1625.98,665.35)
DIP7: HDR_B.36 U1.AD16 | length 471.4
  Top Layer w7.87: U1.AD16@1622.05,1062.99 v1(1641.73,1043.31)
  MidLayer1 w5: v1(1641.73,1043.31) 1641.74,921.26 1641.73,909.45 1641.73,704.72 v2(1657.48,688.98)
  Bottom Layer w7.87: HDR_B.36@1657.48,606.3 v2(1657.48,688.98)
DONE: R25.2 U1.U20 | length 1399.1
  Top Layer w7.87: U1.U20@1779.53,1338.58 v1(1799.21,1318.9)
  Bottom Layer w5: v1(1799.21,1318.9) 1779.53,1299.21 1779.53,1271.65 1791.34,1259.84 1807.09,1259.84 1818.9,1248.03 1818.9,1192.91 1830.71,1181.1 2007.87,1181.1 2094.49,1267.72 2094.49,1909.45 2177.17,1992.13 2177.17,2100.86 R25.2@2157.48,2120.55
EXTEND_A0: HDR_L.1 U1.B4 | length 1400.9
  Top Layer w5: v2(114.17,2244.09) 177.17,2244.09 196.85,2224.41 409.45,2224.41 ; 385.83,2224.41 507.88,2224.41 519.69,2236.22 1074.8,2236.22 1118.11,2192.91 1118.11,2089.57 1137.8,2069.88 1137.8,2043.31 1137.8,2031.49 1137.8,1996.06 1129.92,1988.19 1129.92,1948.82 U1.B4@1149.61,1929.13
  Bottom Layer w7.87: v2(114.17,2244.09) HDR_L.1@173.23,2244.09
EXTEND_A1: HDR_L.3 U1.A3 | length 1328.5
  Top Layer w5: v2(114.17,2212.6) 153.54,2212.6 ; 137.8,2212.6 177.17,2212.6 188.98,2200.79 409.45,2200.79 ; 377.95,2200.79 507.88,2200.79 515.75,2192.91 535.43,2192.91 562.99,2220.47 1007.87,2220.47 1108.11,2120.24 1108.11,2043.96 1090.55,2026.4 1090.55,2007.87 1110.24,1988.19 U1.A3@1110.24,1968.5
  Bottom Layer w7.87: v2(114.17,2212.6) HDR_L.3@173.23,2212.6
EXTEND_A2: HDR_L.5 U1.B3 | length 1314.2
  Top Layer w5: v2(114.17,2181.1) 157.48,2181.1 ; 137.8,2181.1 177.17,2181.1 196.85,2161.42 507.88,2161.42 519.69,2173.23 539.37,2173.23 570.87,2204.72 1003.94,2204.72 1047.24,2161.42 1047.24,2043.31 1047.24,2031.5 1047.24,2019.68 1090.55,1976.38 1090.55,1948.82 U1.B3@1110.24,1929.13
  Bottom Layer w7.87: v2(114.17,2181.1) HDR_L.5@173.23,2181.1
EXTEND_A3: HDR_L.7 U1.A2 | length 1129.7
  Top Layer w5: v2(114.17,2149.61) 153.54,2149.61 ; 137.8,2149.61 177.17,2149.61 ; 188.98,2137.8 177.17,2149.61 ; U1.A2@1070.87,1968.5 968.5,1968.5 956.69,1968.5 944.88,1968.5 870.08,2043.31 515.75,2043.31 507.87,2035.43 291.34,2035.43 177.16,2149.61
  Bottom Layer w7.87: v2(114.17,2149.61) HDR_L.7@173.23,2149.6
EXTEND_A4: HDR_L.9 U1.B2 | length 1185.8
  Top Layer w5: v2(114.17,2118.11) 149.6,2118.11 ; 137.8,2118.11 177.17,2118.11 ; 196.85,2098.43 177.17,2118.11 ; U1.B2@1070.87,1929.13 1051.18,1948.82 968.5,1948.82 956.69,1948.82 944.88,1948.82 860.39,2033.31 563.16,2033.31 533.79,2003.94 515.75,2003.94 507.87,2011.81 283.46,2011.81 177.16,2118.11
  Top Layer w7.87: 1051.18,1948.82 U1.B2@1070.87,1929.13
  Bottom Layer w7.87: v2(114.17,2118.11) HDR_L.9@173.23,2118.11
EXTEND_A5: HDR_L.11 U1.B1 | length 1112.3
  Top Layer w5: v2(114.17,2086.62) 149.61,2086.62 ; 137.8,2086.61 177.17,2086.61 ; 188.98,2074.8 177.17,2086.61 ; U1.B1@1031.5,1929.13 968.5,1929.13 956.69,1929.13 940.94,1929.13 846.77,2023.31 567.3,2023.31 524.31,1980.31 515.75,1980.31 507.87,1972.44 291.34,1972.44 177.16,2086.61
  Bottom Layer w7.87: v2(114.17,2086.62) HDR_L.11@173.23,2086.61
EXTEND_A6: HDR_L.13 U1.C2 | length 1153.3
  Top Layer w5: v2(114.17,2055.12) 149.61,2055.12 ; 137.8,2055.12 177.16,2055.12 ; 196.85,2035.43 177.17,2055.12 ; U1.C2@1070.87,1889.76 1051.18,1909.45 968.5,1909.45 956.69,1909.45 919.24,1909.45 903.16,1925.54 872.34,1925.54 836.88,1890.08 585.64,1890.08 534.77,1940.94 515.75,1940.94 507.87,1948.82 283.46,1948.82 177.16,2055.12
  Bottom Layer w7.87: v2(114.17,2055.12) HDR_L.13@173.23,2055.12
EXTEND_A7: HDR_L.15 U1.C1 | length 1064.7
  Top Layer w5: v2(114.17,2023.62) 149.61,2023.62 ; 137.8,2023.62 177.16,2023.62 291.34,1909.45 507.87,1909.45 523.62,1925.2 536.38,1925.2 581.5,1880.08 931.26,1880.08 940.94,1889.77 956.69,1889.77 968.5,1889.76 U1.C1@1031.5,1889.76
  Bottom Layer w7.87: v2(114.17,2023.62) HDR_L.15@173.23,2023.62
EXTEND_A8: HDR_L.17 U1.D2 | length 1090.4
  Top Layer w5: v2(114.17,1992.13) 149.61,1992.13 ; 137.8,1992.13 177.16,1992.13 283.46,1885.83 507.87,1885.83 523.62,1870.08 960.83,1870.08 ; 956.69,1870.08 968.5,1870.08 1051.18,1870.08 U1.D2@1070.87,1850.39
  Bottom Layer w7.87: v2(114.17,1992.13) HDR_L.17@173.23,1992.12
EXTEND_A9: HDR_L.19 U1.D1 | length 1040.4
  Top Layer w5: v2(114.17,1960.63) 149.61,1960.63 ; 137.8,1960.63 177.16,1960.63 291.34,1846.46 507.87,1846.46 515.75,1854.33 913.39,1854.33 917.32,1850.39 956.69,1850.39 968.5,1850.39 U1.D1@1031.5,1850.39
  Bottom Layer w7.87: v2(114.17,1960.63) HDR_L.19@173.23,1960.63
EXTEND_A10: HDR_L.21 U1.E2 | length 1092.8
  Top Layer w5: v2(114.17,1929.13) 149.61,1929.13 ; 137.8,1929.13 177.16,1929.13 283.46,1822.83 507.87,1822.83 515.75,1814.96 830.71,1814.96 850.39,1834.65 929.13,1834.65 933.07,1830.71 956.69,1830.71 968.5,1830.71 1051.18,1830.71 U1.E2@1070.87,1811.02
  Bottom Layer w7.87: v2(114.17,1929.13) HDR_L.21@173.23,1929.13
EXTEND_A11: HDR_L.23 U1.E1 | length 1056.7
  Top Layer w5: v2(114.17,1897.64) 149.61,1897.64 ; 137.8,1897.64 177.16,1897.64 291.34,1783.46 507.87,1783.46 515.75,1791.34 830.71,1791.34 862.2,1822.83 917.32,1822.83 929.13,1811.02 956.69,1811.02 968.5,1811.02 U1.E1@1031.5,1811.02
  Bottom Layer w7.87: v2(114.17,1897.64) HDR_L.23@173.23,1897.64
EXTEND_A12: HDR_L.25 U1.F2 | length 1099.3
  Top Layer w5: v2(114.17,1866.14) 149.61,1866.14 ; 137.8,1866.14 177.16,1866.14 283.46,1759.84 507.87,1759.84 515.75,1751.97 609.25,1751.97 625,1767.72 905.51,1767.72 917.32,1779.53 956.69,1779.53 968.5,1779.53 1003.94,1779.53 1015.75,1791.34 1051.18,1791.34 U1.F2@1070.87,1771.65
  Bottom Layer w7.87: v2(114.17,1866.14) HDR_L.25@173.23,1866.14
EXTEND_A13: HDR_L.27 U1.F1 | length 1056.7
  Top Layer w5: v2(114.17,1834.65) 149.61,1834.65 ; 137.8,1834.65 177.16,1834.65 291.34,1720.47 507.87,1720.47 515.75,1728.35 610.24,1728.35 637.8,1755.91 909.45,1755.91 917.32,1763.78 956.69,1763.78 968.5,1763.78 1007.87,1763.78 1015.75,1771.65 U1.F1@1031.5,1771.65
  Bottom Layer w7.87: v2(114.17,1834.65) HDR_L.27@173.23,1834.64
EXTEND_A14: HDR_L.29 U1.G2 | length 1105.2
  Top Layer w5: v2(114.17,1803.15) 145.67,1803.15 ; 137.8,1803.15 177.16,1803.15 283.46,1696.85 507.87,1696.85 515.75,1688.98 594.49,1688.98 649.61,1744.09 913.39,1744.09 917.32,1748.03 956.69,1748.03 968.5,1748.03 1011.81,1748.03 1015.75,1751.97 1051.18,1751.97 U1.G2@1070.87,1732.28
  Bottom Layer w7.87: v2(114.17,1803.15) HDR_L.29@173.23,1803.15
EXTEND_A15: HDR_L.31 U1.G1 | length 1062.5
  Top Layer w5: v2(114.17,1771.65) 145.67,1771.65 ; 137.8,1771.65 177.16,1771.65 291.34,1657.48 507.87,1657.48 515.75,1665.35 599.41,1665.35 666.34,1732.28 956.69,1732.28 968.5,1732.28 U1.G1@1031.5,1732.28
  Bottom Layer w7.87: v2(114.17,1771.65) HDR_L.31@173.23,1771.65
EXTEND_A16: HDR_L.33 U1.H2 | length 1114.9
  Top Layer w5: v2(114.17,1740.16) 145.67,1740.16 ; 137.8,1740.16 177.16,1740.16 283.46,1633.86 507.87,1633.86 515.75,1625.98 586.61,1625.98 673.23,1712.6 956.69,1712.6 968.5,1712.6 1019.68,1712.6 1051.18,1712.6 U1.H2@1070.87,1692.91
  Bottom Layer w7.87: v2(114.17,1740.16) HDR_L.33@173.23,1740.15
EXTEND_A17: HDR_L.35 U1.H1 | length 1076.3
  Top Layer w5: v2(114.17,1708.66) 149.61,1708.66 ; 137.8,1708.66 177.16,1708.66 291.34,1594.49 507.87,1594.49 515.75,1602.36 590.55,1602.36 681.1,1692.91 956.69,1692.91 968.5,1692.91 U1.H1@1031.5,1692.91
  Bottom Layer w7.87: v2(114.17,1708.66) HDR_L.35@173.23,1708.66
EXTEND_A18: HDR_L.37 U1.J2 | length 1128.7
  Top Layer w5: v2(114.17,1677.17) 149.61,1677.17 ; 137.8,1677.17 177.16,1677.17 283.46,1570.86 507.87,1570.86 515.75,1562.99 574.8,1562.99 685.04,1673.23 956.69,1673.23 968.5,1673.23 1051.18,1673.23 U1.J2@1070.87,1653.54
  Bottom Layer w7.87: v2(114.17,1677.17) HDR_L.37@173.23,1677.16
EXTEND_A19: HDR_L.39 U1.J1 | length 1089.3
  Top Layer w5: v2(114.17,1645.67) 149.61,1645.67 ; 137.8,1645.67 177.16,1645.67 291.34,1531.49 507.87,1531.49 515.75,1539.37 574.8,1539.37 692.91,1657.48 956.69,1657.48 968.5,1657.48 1011.81,1657.48 1015.75,1653.54 U1.J1@1031.5,1653.54
  Bottom Layer w7.87: v2(114.17,1645.67) HDR_L.39@173.23,1645.67
EXTEND_A20: HDR_L.41 U1.K2 | length 1138.4
  Top Layer w5: v2(114.17,1614.17) 149.61,1614.17 ; 137.8,1614.17 177.16,1614.17 283.46,1507.87 507.87,1507.87 515.75,1500 559.05,1500 669.29,1610.24 917.32,1610.24 940.94,1633.86 956.69,1633.86 968.5,1633.86 1051.18,1633.86 U1.K2@1070.87,1614.17
  Bottom Layer w7.87: v2(114.17,1614.17) HDR_L.41@173.23,1614.17
EXTEND_A21: HDR_L.43 U1.K1 | length 1095.8
  Top Layer w5: v2(114.17,1582.68) 149.61,1582.68 ; 137.8,1582.68 177.16,1582.68 291.34,1468.5 507.87,1468.5 515.75,1476.38 559.05,1476.38 681.1,1598.43 929.13,1598.43 944.88,1614.17 956.69,1614.17 968.5,1614.17 U1.K1@1031.5,1614.17
  Bottom Layer w7.87: v2(114.17,1582.68) HDR_L.43@173.23,1582.67
EXTEND_A22: HDR_L.45 U1.L2 | length 1136.4
  Top Layer w5: v2(114.17,1551.18) 177.16,1551.18 283.46,1444.88 507.87,1444.88 515.75,1437.01 543.31,1437.01 692.91,1586.61 944.88,1586.61 952.76,1594.49 956.69,1594.49 968.5,1594.49 1051.18,1594.49 U1.L2@1070.87,1574.8
  Bottom Layer w7.87: v2(114.17,1551.18) HDR_L.45@173.23,1551.18
EXTEND_A23: HDR_L.47 U1.L1 | length 1093.8
  Top Layer w5: v2(114.17,1519.69) 177.16,1519.69 291.34,1405.51 507.87,1405.51 519.68,1417.32 551.18,1417.32 708.66,1574.8 956.69,1574.8 968.5,1574.8 U1.L1@1031.5,1574.8
  Bottom Layer w7.87: v2(114.17,1519.69) HDR_L.47@173.23,1519.68
EXTEND_A24: HDR_L.49 U1.M2 | length 1129.9
  Top Layer w5: v2(114.17,1488.19) 177.16,1488.19 283.46,1381.89 507.87,1381.89 515.75,1374.01 539.37,1374.01 681.1,1515.75 956.69,1515.75 968.5,1515.75 1051.18,1515.75 U1.M2@1070.87,1535.43
  Bottom Layer w7.87: v2(114.17,1488.19) HDR_L.49@173.23,1488.19
EXTEND_A25: HDR_L.51 U1.P1 | length 1071
  Top Layer w5: v2(114.17,1456.69) 177.16,1456.69 291.34,1342.52 507.87,1342.52 519.68,1354.33 551.18,1354.33 622.05,1425.2 897.64,1425.2 929.13,1456.69 956.69,1456.69 968.5,1456.69 U1.P1@1031.5,1456.69
  Bottom Layer w7.87: v2(114.17,1456.69) HDR_L.51@173.23,1456.69
EXTEND_A26: HDR_L.53 U1.R1 | length 1067.7
  Top Layer w5: v2(114.17,1425.2) 177.16,1425.2 283.46,1318.9 507.87,1318.9 515.75,1311.02 559.05,1311.02 641.73,1393.7 913.39,1393.7 937.01,1417.32 956.69,1417.32 968.5,1417.32 U1.R1@1031.5,1417.32
  Bottom Layer w7.87: v2(114.17,1425.2) HDR_L.53@173.23,1425.19
EXTEND_A27: HDR_L.55 U1.T2 | length 1103.8
  Top Layer w5: v2(114.17,1393.7) 177.16,1393.7 291.34,1279.53 507.87,1279.53 515.75,1287.4 590.55,1287.4 661.42,1358.27 956.69,1358.27 968.5,1358.27 1051.18,1358.27 U1.T2@1070.87,1377.95
  Bottom Layer w7.87: v2(114.17,1393.7) HDR_L.55@173.23,1393.7
EXTEND_A28: HDR_L.57 U1.U2 | length 1100.5
  Top Layer w5: v2(114.17,1362.21) 177.16,1362.21 283.46,1255.9 507.87,1255.9 515.75,1248.03 606.3,1248.03 677.17,1318.9 956.69,1318.9 968.51,1318.9 1051.18,1318.9 U1.U2@1070.87,1338.58
  Bottom Layer w7.87: v2(114.17,1362.21) HDR_L.57@173.23,1362.2
EXTEND_A29: HDR_L.59 U1.V2 | length 1105.2
  Top Layer w5: v2(114.17,1330.71) 177.16,1330.71 291.34,1216.54 507.87,1216.54 515.75,1224.41 637.8,1224.41 692.91,1279.53 850.39,1279.53 859.99,1289.12 923.47,1289.12 933.07,1279.53 956.69,1279.53 968.51,1279.53 1051.18,1279.53 U1.V2@1070.87,1299.21
  Bottom Layer w7.87: v2(114.17,1330.71) HDR_L.59@173.23,1330.71
EXTEND_A30: HDR_L.61 U1.W2 | length 1094
  Top Layer w5: v2(114.17,1299.21) 177.16,1299.21 283.46,1192.91 507.87,1192.91 515.75,1185.04 653.54,1185.04 700.79,1232.28 933.07,1232.28 940.95,1240.16 956.69,1240.16 968.51,1240.16 1051.18,1240.16 U1.W2@1070.87,1259.84
  Bottom Layer w7.87: v2(114.17,1299.21) HDR_L.61@173.23,1299.21
EXTEND_A31: HDR_L.63 U1.Y2 | length 1090.8
  Top Layer w5: v2(114.17,1267.72) 177.16,1267.72 291.34,1153.54 507.87,1153.54 515.75,1161.42 688.98,1161.42 728.35,1200.79 956.69,1200.79 968.5,1200.79 1051.18,1200.79 U1.Y2@1070.87,1220.47
  Bottom Layer w7.87: v2(114.17,1267.72) HDR_L.63@173.23,1267.71
EXTEND_A32: HDR_L.65 U1.AA2 | length 1087.5
  Top Layer w5: v2(114.17,1236.22) 177.16,1236.22 283.46,1129.92 507.87,1129.92 515.75,1122.05 704.72,1122.05 744.09,1161.42 956.69,1161.42 968.51,1161.42 1051.18,1161.42 U1.AA2@1070.87,1181.1
  Bottom Layer w7.87: v2(114.17,1236.22) HDR_L.65@173.23,1236.22
EXTEND_A33: HDR_L.67 U1.AB2 | length 1094
  Top Layer w5: v2(114.17,1204.72) 177.16,1204.73 291.34,1090.55 507.87,1090.55 515.75,1098.43 732.28,1098.43 744.09,1086.62 913.39,1086.62 948.82,1122.05 956.69,1122.05 968.5,1122.05 1051.18,1122.05 U1.AB2@1070.87,1141.73
  Bottom Layer w7.87: v2(114.17,1204.72) HDR_L.67@173.23,1204.72
EXTEND_A34: HDR_L.69 U1.AC2 | length 1100.5
  Top Layer w5: v2(114.17,1173.23) 177.16,1173.23 283.46,1066.93 507.87,1066.93 515.75,1059.05 562.99,1059.05 586.61,1035.43 716.54,1035.43 736.22,1055.12 917.32,1055.12 944.88,1082.68 956.69,1082.68 968.51,1082.68 1051.18,1082.68 U1.AC2@1070.87,1102.36
  Bottom Layer w7.87: v2(114.17,1173.23) HDR_L.69@173.23,1173.23
EXTEND_A35: HDR_L.71 U1.P6 | length 1326.5
  Top Layer w7.87: v1(1208.66,1437.01) U1.P6@1228.35,1456.69
  MidLayer2 w5: v2(114.17,1141.73) 145.67,1141.73 448.81,1444.88 507.87,1444.88 519.68,1433.07 909.45,1433.07 925.2,1417.32 956.69,1417.32 968.51,1417.32 1188.98,1417.32 v1(1208.66,1437.01)
  Bottom Layer w7.87: v2(114.17,1141.73) HDR_L.71@173.23,1141.73
EXTEND_A36: HDR_L.73 U1.R6 | length 1333
  Top Layer w7.87: v1(1208.66,1397.64) U1.R6@1228.35,1417.32
  MidLayer2 w5: v2(114.17,1110.24) 145.67,1110.24 440.94,1405.51 507.87,1405.51 519.69,1417.32 874.02,1417.32 913.39,1377.95 956.69,1377.95 968.51,1377.95 1188.98,1377.95 v1(1208.66,1397.64)
  Bottom Layer w7.87: v2(114.17,1110.24) HDR_L.73@173.23,1110.23
EXTEND_A37: HDR_L.75 U1.T6 | length 1333
  Top Layer w7.87: v1(1208.66,1358.27) U1.T6@1228.35,1377.95
  MidLayer2 w5: v2(114.17,1078.74) 145.67,1078.74 448.81,1381.89 507.87,1381.89 519.68,1370.08 877.95,1370.08 909.45,1338.58 956.69,1338.58 968.51,1338.58 1188.98,1338.58 v1(1208.66,1358.27)
  Bottom Layer w7.87: v2(114.17,1078.74) HDR_L.75@173.23,1078.74
EXTEND_A38: HDR_L.77 U1.U5 | length 1300.2
  Top Layer w7.87: v1(1169.29,1318.9) U1.U5@1188.98,1338.58
  MidLayer2 w5: v2(114.17,1047.24) 145.67,1047.24 440.94,1342.52 507.87,1342.52 519.69,1354.33 874.02,1354.33 929.13,1299.21 956.69,1299.21 968.5,1299.21 1149.61,1299.21 v1(1169.29,1318.9)
  Bottom Layer w7.87: v2(114.17,1047.24) HDR_L.77@173.23,1047.24
EXTEND_A39: HDR_L.79 U1.W7 | length 1378.9
  Top Layer w7.87: v1(1248.03,1240.16) U1.W7@1267.72,1259.84
  MidLayer2 w5: v2(114.17,1015.75) 145.67,1015.75 448.81,1318.9 507.87,1318.9 519.68,1307.09 901.58,1307.09 948.82,1259.84 956.69,1259.84 968.5,1259.84 1228.34,1259.84 v1(1248.03,1240.16)
  Bottom Layer w7.87: v2(114.17,1015.75) HDR_L.79@173.23,1015.74
EXTEND_A40: HDR_L.81 U1.W6 | length 1346.1
  Top Layer w7.87: v1(1208.66,1240.16) U1.W6@1228.35,1259.84
  MidLayer2 w5: v2(114.17,984.25) 145.67,984.25 440.94,1279.53 507.87,1279.53 519.69,1291.34 814.96,1291.34 885.83,1220.47 956.69,1220.47 968.5,1220.47 1188.97,1220.47 v1(1208.66,1240.16)
  Bottom Layer w7.87: v2(114.17,984.25) HDR_L.81@173.23,984.25
EXTEND_A41: HDR_L.83 U1.Y5 | length 1306.7
  Top Layer w7.87: v1(1169.29,1200.79) U1.Y5@1188.98,1220.47
  MidLayer2 w5: v2(114.17,952.76) 145.67,952.75 448.81,1255.9 507.87,1255.9 519.69,1244.09 842.52,1244.09 905.51,1181.1 956.69,1181.1 968.5,1181.1 1149.61,1181.1 v1(1169.29,1200.79)
  Bottom Layer w7.87: v2(114.17,952.76) HDR_L.83@173.23,952.75
EXTEND_A42: HDR_L.85 U1.AA5 | length 1313.2
  Top Layer w7.87: v1(1169.29,1161.42) U1.AA5@1188.98,1181.1
  MidLayer2 w5: v2(114.17,921.26) 145.67,921.26 440.94,1216.53 507.87,1216.53 519.69,1228.34 838.58,1228.34 925.2,1141.73 956.69,1141.73 968.5,1141.73 1149.61,1141.73 v1(1169.29,1161.42)
  Bottom Layer w7.87: v2(114.17,921.26) HDR_L.85@173.23,921.26
EXTEND_A43: HDR_L.87 U1.AA6 | length 1385.1
  Top Layer w7.87: v1(1208.66,1161.42) U1.AA6@1228.35,1181.1
  MidLayer2 w5: v2(114.17,889.76) 145.67,889.76 448.81,1192.91 507.87,1192.91 519.69,1181.1 866.14,1181.1 944.88,1102.36 956.69,1102.36 968.5,1102.36 1177.17,1102.36 1188.98,1114.17 1188.98,1141.73 v1(1208.66,1161.42)
  Bottom Layer w7.87: v2(114.17,889.76) HDR_L.87@173.23,889.76
EXTEND_A44: HDR_L.89 U1.T5 | length 1349.1
  Top Layer w7.87: v1(1169.29,1358.27) U1.T5@1188.98,1377.95
  MidLayer3 w5: v2(114.17,858.27) 149.61,858.27 629.92,1338.58 956.69,1338.58 968.5,1338.58 1149.61,1338.58 v1(1169.29,1358.27)
  Bottom Layer w7.87: v2(114.17,858.27) HDR_L.89@173.23,858.26
EXTEND_A45: HDR_L.91 U1.W5 | length 1313.2
  Top Layer w7.87: v1(1169.29,1240.16) U1.W5@1188.98,1259.84
  MidLayer3 w5: v2(114.17,826.77) 181.1,826.77 574.8,1220.47 956.69,1220.47 968.5,1220.47 1149.61,1220.47 v1(1169.29,1240.16)
  Bottom Layer w7.87: v2(114.17,826.77) HDR_L.91@173.23,826.77
EXTEND_A46: HDR_L.93 U1.Y6 | length 1349.4
  Top Layer w7.87: v1(1208.66,1200.79) U1.Y6@1228.35,1220.47
  MidLayer3 w5: v2(114.17,795.28) 212.6,795.28 598.43,1181.1 956.69,1181.1 968.5,1181.1 1188.98,1181.1 v1(1208.66,1200.79)
  Bottom Layer w7.87: v2(114.17,795.28) HDR_L.93@173.23,795.27
EXTEND_A47: HDR_L.95 U1.AB6 | length 1346.1
  Top Layer w7.87: v1(1208.66,1122.05) U1.AB6@1228.35,1141.73
  MidLayer3 w5: v2(114.17,763.78) 244.09,763.78 622.05,1141.73 956.69,1141.73 968.5,1141.73 1188.97,1141.73 v1(1208.66,1122.05)
  Bottom Layer w7.87: v2(114.17,763.78) HDR_L.95@173.23,763.78
EXTEND_A48: HDR_L.97 U1.AB5 | length 1324.2
  Top Layer w7.87: v1(1169.29,1122.05) U1.AB5@1188.98,1141.73
  MidLayer3 w5: v2(114.17,732.28) 275.59,732.28 556.59,1013.28 556.59,1048.72 590.55,1082.68 625.98,1082.68 913.39,1082.68 933.07,1102.36 956.69,1102.36 968.5,1102.36 1149.61,1102.36 v1(1169.29,1122.05)
  Bottom Layer w7.87: v2(114.17,732.28) HDR_L.97@173.23,732.28
EXTEND_A49: HDR_L.99 U1.AC4 | length 1260.8
  Top Layer w7.87: v1(1129.92,1082.68) U1.AC4@1149.61,1102.36
  MidLayer3 w5: v2(114.17,700.79) 307.09,700.79 633.86,1027.56 811.02,1027.56 846.46,1062.99 956.69,1062.99 968.5,1062.99 1110.24,1062.99 v1(1129.92,1082.68)
  Bottom Layer w7.87: v2(114.17,700.79) HDR_L.99@173.23,700.78
EXTEND_B0: HDR_L.2 U1.C3 | length 816.1
  Top Layer w7.87: v1(1090.55,1909.45) U1.C3@1110.24,1889.76
  MidLayer1 w5: v2(500,2244.1) 523.62,2244.1 758.99,2008.73 829.85,2008.73 929.13,1909.45 956.69,1909.45 968.5,1909.45 v1(1090.55,1909.45)
  Bottom Layer w7.87: HDR_L.2@440.94,2244.09 v2(500,2244.1)
EXTEND_B1: HDR_L.4 U1.D3 | length 819.3
  Top Layer w7.87: v1(1090.55,1870.08) U1.D3@1110.24,1850.39
  MidLayer1 w5: v2(523.62,2212.6) 772.4,1963.82 789.18,1947.04 815.41,1947.04 892.37,1870.08 956.69,1870.08 968.5,1870.08 v1@1090.55,1870.08
  Bottom Layer w7.87: HDR_L.4@440.94,2212.6 v2(523.62,2212.6)
EXTEND_B2: HDR_L.6 U1.E5 | length 969.2
  Top Layer w7.87: v1@1169.28,1826.78 U1.E5@1188.97,1807.09 ; v1(1169.29,1830.71) U1.E5@1188.98,1811.02 v1(1169.29,1830.71)
  MidLayer1 w5: v2(500,2181.1) 523.62,2181.1 768.09,1936.63 768.09,1926.37 844.07,1850.39 956.69,1850.39 968.5,1850.39 1149.61,1850.39 v1(1169.29,1830.71) ; v1@1167.32,1828.74 1169.68,1829.53 v1@1173.23,1830.71
  Bottom Layer w7.87: HDR_L.6@440.94,2181.1 v2(500,2181.1)
EXTEND_B3: HDR_L.8 U1.E3 | length 809.5
  Top Layer w7.87: v1(1090.55,1830.71) U1.E3@1110.24,1811.02
  MidLayer1 w5: v2(523.62,2149.61) 834.65,1838.58 929.13,1838.58 937.01,1830.71 956.69,1830.71 968.5,1830.71 v1(1090.55,1830.71)
  Bottom Layer w7.87: HDR_L.8@440.94,2149.6 v2(523.62,2149.61)
EXTEND_B4: HDR_L.10 U1.F4 | length 852.2
  Top Layer w7.87: v1(1129.92,1791.34) U1.F4@1149.61,1771.65
  MidLayer1 w5: v2(500,2118.11) 523.62,2118.11 818.9,1822.83 917.32,1822.83 929.13,1811.02 956.69,1811.02 968.5,1811.02 1110.24,1811.02 v1(1129.92,1791.34)
  Bottom Layer w7.87: HDR_L.10@440.94,2118.11 v2(500,2118.11)
EXTEND_B5: HDR_L.12 U1.F3 | length 812.8
  Top Layer w7.87: v1(1090.55,1791.34) U1.F3@1110.24,1771.65
  MidLayer1 w5: v2(523.62,2086.62) 834.65,1775.59 917.32,1775.59 933.07,1791.34 956.69,1791.34 968.5,1791.34 v1@1090.55,1791.34
  Bottom Layer w7.87: HDR_L.12@440.94,2086.61 v2(523.62,2086.62)
EXTEND_B6: HDR_L.14 U1.G4 | length 848.9
  Top Layer w7.87: v1(1129.92,1751.97) U1.G4@1149.61,1732.28
  MidLayer1 w5: v2(500,2055.12) 523.62,2055.12 814.96,1763.78 937.01,1763.78 944.88,1771.65 956.69,1771.65 968.5,1771.65 1110.24,1771.65 v1(1129.92,1751.97)
  Bottom Layer w7.87: HDR_L.14@440.94,2055.12 v2(500,2055.12)
EXTEND_B7: HDR_L.16 U1.G3 | length 790
  Top Layer w7.87: v1(1090.55,1751.97) U1.G3@1110.24,1732.28
  MidLayer1 w5: v2(523.62,2023.62) 795.28,1751.97 956.69,1751.97 968.5,1751.97 v1@1090.55,1751.97
  Bottom Layer w7.87: HDR_L.16@440.94,2023.62 v2(523.62,2023.62)
EXTEND_B8: HDR_L.18 U1.H4 | length 832.6
  Top Layer w7.87: v1(1129.92,1712.6) U1.H4@1149.61,1692.91
  MidLayer1 w5: v2(500,1992.13) 523.62,1992.13 783.47,1732.28 956.69,1732.28 968.5,1732.28 1110.24,1732.28 v1(1129.92,1712.6)
  Bottom Layer w7.87: HDR_L.18@440.94,1992.12 v2(500,1992.13)
EXTEND_B9: HDR_L.20 U1.H3 | length 780.2
  Top Layer w7.87: v1(1090.55,1712.6) U1.H3@1110.24,1692.91
  MidLayer1 w5: v2(523.62,1960.63) 771.66,1712.6 956.69,1712.6 968.5,1712.6 v1@1090.55,1712.6
  Bottom Layer w7.87: HDR_L.20@440.94,1960.63 v2(523.62,1960.63)
EXTEND_B10: HDR_L.22 U1.J4 | length 822.8
  Top Layer w7.87: v1(1129.92,1673.23) U1.J4@1149.61,1653.54
  MidLayer1 w5: v2(500,1929.14) 523.62,1929.14 759.84,1692.91 956.69,1692.91 968.5,1692.91 1110.24,1692.91 v1(1129.92,1673.23)
  Bottom Layer w7.87: HDR_L.22@440.94,1929.13 v2(500,1929.14)
EXTEND_B11: HDR_L.24 U1.J3 | length 770.4
  Top Layer w7.87: v1(1090.55,1673.23) U1.J3@1110.24,1653.54
  MidLayer1 w5: v2(523.62,1897.64) 740.16,1681.1 956.69,1681.1 968.51,1681.1 1059.06,1681.1 1066.93,1673.23 v1@1090.55,1673.23
  Bottom Layer w7.87: HDR_L.24@440.94,1897.64 v2(523.62,1897.64)